# Altium PCB SplitFlapDriverATtiny1616V4.kicad_pcb(1).PcbDoc
Units mm, origin at the board's own origin, x right, y up, seen from the top; angles counter-clockwise.
Board outline 30 x 60 mm, 2 copper layers (F.Cu, B.Cu); 25 components, 38 nets, 103 pads, 22 vias.
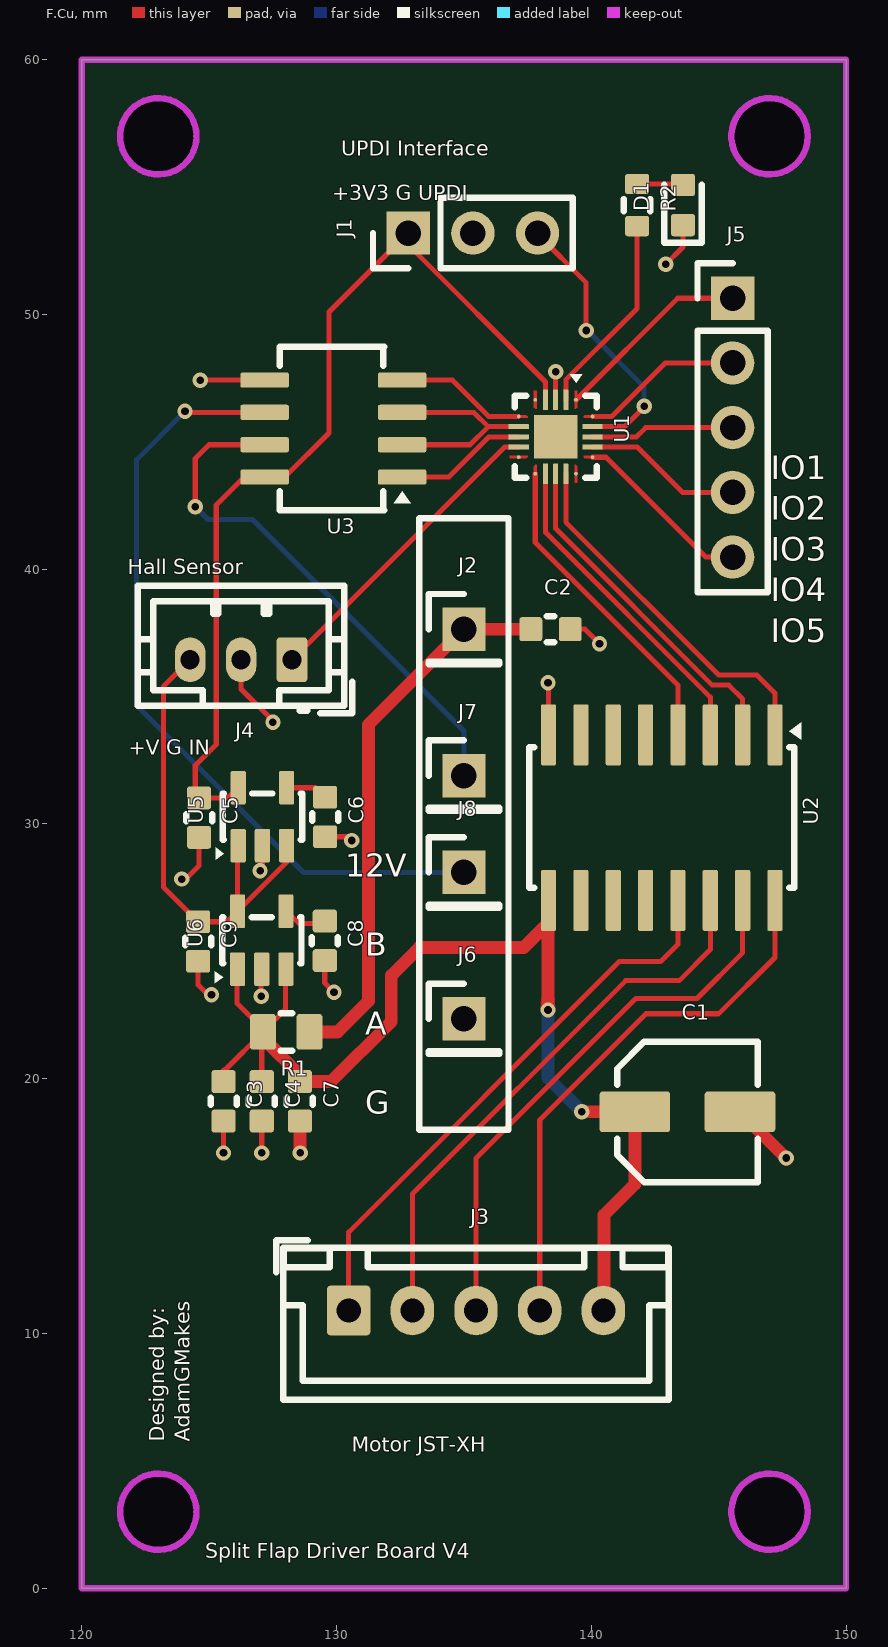
[diagram p0: F.Cu view]
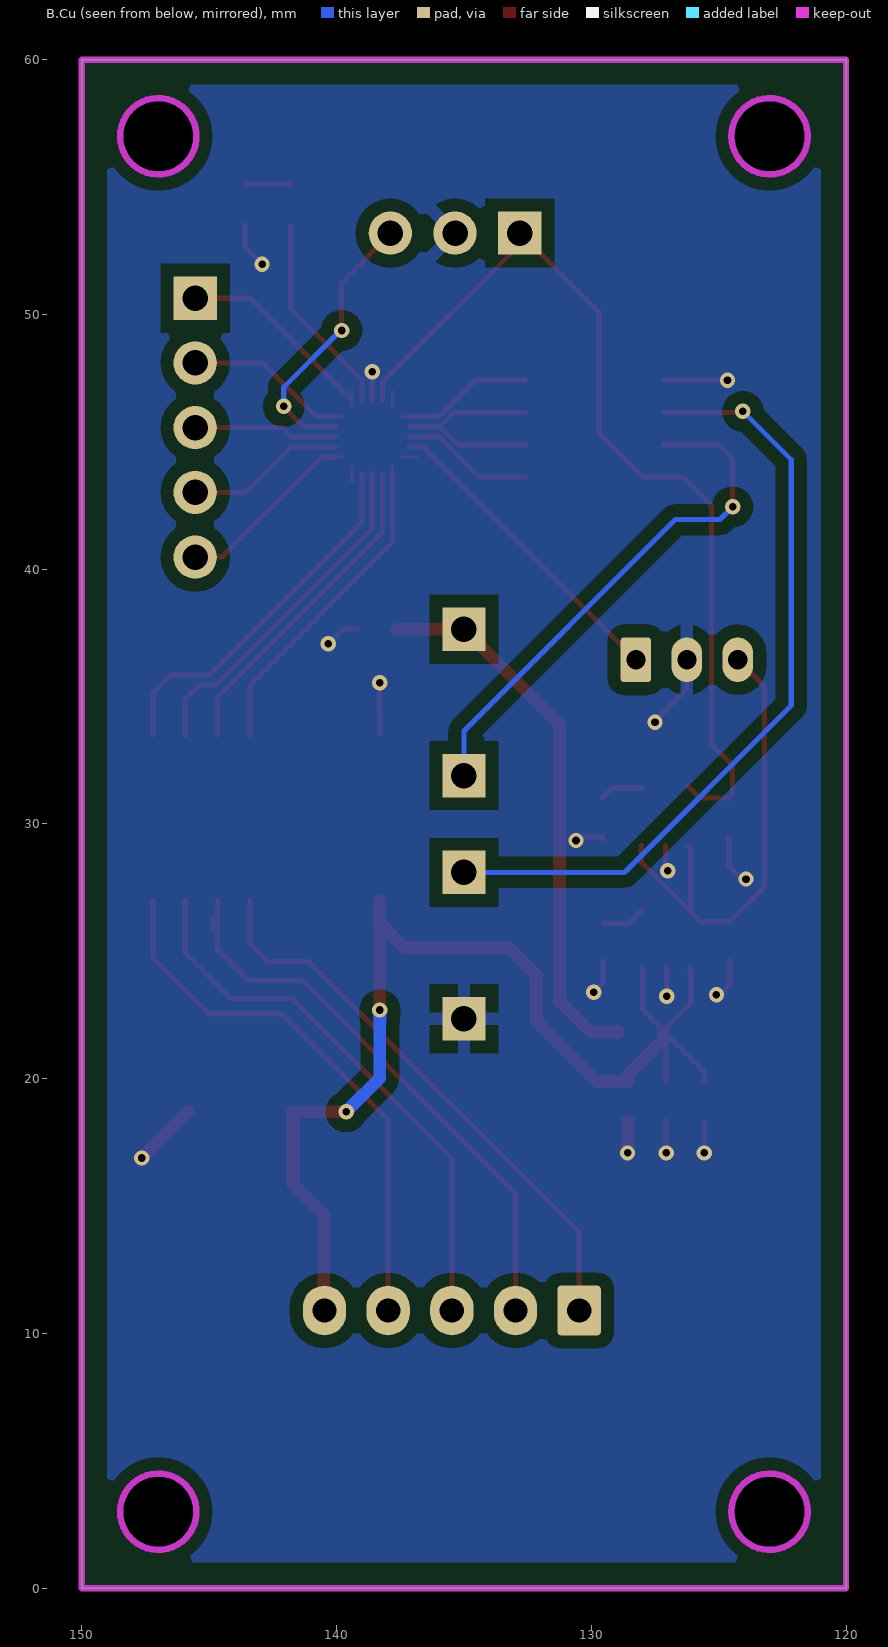
[diagram p1: B.Cu view, seen from below]

## Layer stack, top to bottom
F.Mask: solder mask 0.0102, Solder Resist, Dk 3.5
F.Cu: signal copper 0.0356
Dielectric 1: dielectric 0.32, FR-4, Dk 4.8
B.Cu: signal copper 0.0356
B.Mask: solder mask 0.0102, Solder Resist, Dk 3.5

## Board outline
120,60 120,0 150,0 150,60 120,60
cut-out: 148.507,3 148.478,3.294 148.393,3.577 148.253,3.837 148.066,4.066 147.837,4.253 147.577,4.393 147.294,4.478 147,4.507 146.706,4.478 146.423,4.393 146.163,4.253 145.934,4.066 145.747,3.837 145.607,3.577 145.522,3.294 145.493,3 145.522,2.706 145.607,2.423 145.747,2.163 145.934,1.934 146.163,1.747 146.423,1.607 146.706,1.522 147,1.493 147.294,1.522 147.577,1.607 147.837,1.747 148.066,1.934 148.253,2.163 148.393,2.423 148.478,2.706 148.507,3
cut-out: 148.507,57 148.478,57.294 148.393,57.577 148.253,57.837 148.066,58.066 147.837,58.253 147.577,58.393 147.294,58.478 147,58.507 146.706,58.478 146.423,58.393 146.163,58.253 145.934,58.066 145.747,57.837 145.607,57.577 145.522,57.294 145.493,57 145.522,56.706 145.607,56.423 145.747,56.163 145.934,55.934 146.163,55.747 146.423,55.607 146.706,55.522 147,55.493 147.294,55.522 147.577,55.607 147.837,55.747 148.066,55.934 148.253,56.163 148.393,56.423 148.478,56.706 148.507,57
cut-out: 124.507,3 124.478,3.294 124.393,3.577 124.253,3.837 124.066,4.066 123.837,4.253 123.577,4.393 123.294,4.478 123,4.507 122.706,4.478 122.423,4.393 122.163,4.253 121.934,4.066 121.747,3.837 121.607,3.577 121.522,3.294 121.493,3 121.522,2.706 121.607,2.423 121.747,2.163 121.934,1.934 122.163,1.747 122.423,1.607 122.706,1.522 123,1.493 123.294,1.522 123.577,1.607 123.837,1.747 124.066,1.934 124.253,2.163 124.393,2.423 124.478,2.706 124.507,3
cut-out: 124.507,57 124.478,57.294 124.393,57.577 124.253,57.837 124.066,58.066 123.837,58.253 123.577,58.393 123.294,58.478 123,58.507 122.706,58.478 122.423,58.393 122.163,58.253 121.934,58.066 121.747,57.837 121.607,57.577 121.522,57.294 121.493,57 121.522,56.706 121.607,56.423 121.747,56.163 121.934,55.934 122.163,55.747 122.423,55.607 122.706,55.522 123,55.493 123.294,55.522 123.577,55.607 123.837,55.747 124.066,55.934 124.253,56.163 124.393,56.423 124.478,56.706 124.507,57

## Design rules (kind name [scope] priority, off if disabled: settings)
Clearance "Clearence 0.5_Polygon" [InNamedPolygon('B.Cu-GND')] p1: gap=0.5 ignorepadtopadclearanceinfootprint=FALSE
Clearance "Clearence 0.1_NetClass" [InNetClass('Default')] p2: gap=0.1 ignorepadtopadclearanceinfootprint=FALSE
MinimumSolderMaskSliver [All] p1: minsoldermaskwidth=0
PolygonConnect Polygon_B.Cu-GND_ConnectDirect [IsNamedPolygon('B.Cu-GND') vs IsVia] p1: connectstyle=Direct reliefconductorwidth=0.254 reliefentries=4 polygonreliefangle="90 Angle" airgapwidth=0.254
PolygonConnect Polygon_B.Cu-GND_ConnectRelief45 [IsNamedPolygon('B.Cu-GND') vs (IsThruPin or IsSMTPin) and (PadShape_AllLayers = 'Round')] p2: connectstyle=Relief reliefconductorwidth=0.5 reliefentries=4 polygonreliefangle="45 Angle" airgapwidth=0.5
PolygonConnect Polygon_B.Cu-GND_ConnectRelief90 [IsNamedPolygon('B.Cu-GND') vs (IsThruPin or IsSMTPin) and (PadShape_AllLayers <> 'Round')] p3: connectstyle=Relief reliefconductorwidth=0.5 reliefentries=4 polygonreliefangle="90 Angle" airgapwidth=0.5
PolygonConnect Polygon_B.Cu-+VBUSF_ConnectDirect [IsNamedPolygon('B.Cu-+VBUSF')] p4: connectstyle=Direct reliefconductorwidth=0.254 reliefentries=4 polygonreliefangle="90 Angle" airgapwidth=0.254
PolygonConnect Polygon_F.Cu-+VBUSF_ConnectDirect [IsNamedPolygon('F.Cu-+VBUSF')] p5: connectstyle=Direct reliefconductorwidth=0.254 reliefentries=4 polygonreliefangle="90 Angle" airgapwidth=0.254
RoutingVias [All] p1: holewidth=0.711 width=1.27 viastyle="Through Hole" minholewidth=0.711 minwidth=1.27 maxholewidth=0.711 maxwidth=1.27
SilkToSilkClearance [All] p1: silktosilkclearance=0
SilkToSolderMaskClearance [IsPad] p1: minsilkscreentomaskgap=0 clearancetoexposedcopper=TRUE
SolderMaskExpansion [All] p1: expansion=0 istentingtop=FALSE
Width [All] p1: maxlimit=10 minlimit=0.254 preferedwidth=0.2 minimp=50.000000 maximp=50.000000 favimp=50.000000
27 further rules are at their usual default settings.

## Classes and differential pairs
net class Default: +3V3 +5V +VBUS +VBUSF DE{slash}RE GND HALL_IN IO1 IO2 IO3 IO4 IO5 M1 M2 M3 M4 Net-(D1-A) Net-(U5-BP) Net-(U6-BP) RS465_A RS465_B RXD STATUS_LED TXD ULN_IN1 ULN_IN2 ULN_IN3 ULN_IN4 unconnected-(U1-PA4-Pad5) unconnected-(U1-PB4-Pad10) unconnected-(U1-PC0-Pad15) unconnected-(U2-I5-Pad5) unconnected-(U2-I6-Pad6) unconnected-(U2-I7-Pad7) unconnected-(U2-O5-Pad12) unconnected-(U2-O6-Pad11) unconnected-(U2-O7-Pad10) UPDI

## Components (designator, comment, footprint, x,y, rotation, side; value= is the part's Value field where it differs from the comment)
C1 "Comment" C_Elec_5x5.4 143.775,18.7 r0 top value=100u
C2 "Comment" C_0603_1608Metric 138.4,37.65 r0 top value=470n
C3 "Comment" C_0603_1608Metric 125.562,19.112 r270 top value=470n
C4 "Comment" C_0603_1608Metric 127.062,19.112 r270 top value=10u
C5 "Comment" C_0603_1608Metric 124.6,30.25 r270 top value=10u
C6 "Comment" C_0603_1608Metric 129.55,30.275 r270 top value=470n
C7 "Comment" C_0603_1608Metric 128.562,19.112 r270 top value=100n
C8 "Comment" C_0603_1608Metric 129.538,25.412 r270 top value=470n
C9 "Comment" C_0603_1608Metric 124.562,25.388 r270 top value=10u
D1 "Comment" LED_0603_1608Metric 143.6,54.3 r90 top value=LED
J1 "Comment" PinHeader_1x03_P2.54mm_Vertical 132.81,53.2 r90 top value="UPDI Programming"
J2 "Comment" PinHeader_1x01_P2.54mm_Vertical 135,37.65 r0 top value=Conn_01x01_Pin
J3 "Comment" JST_XH_B5B-XH-A_1x05_P2.50mm_Vertical 130.475,10.9 r0 top value="Stepper Connector"
J4 "Comment" JST_PH_B3B-PH-K_1x03_P2.00mm_Vertical 128.25,36.45 r180 top value="Hall Effect"
J5 "Comment" PinHeader_1x05_P2.54mm_Vertical 145.55,50.64 r0 top value=Conn_01x05_Pin
J6 "Comment" PinHeader_1x01_P2.54mm_Vertical 135,22.35 r0 top value=Conn_01x01_Pin
J7 "Comment" PinHeader_1x01_P2.54mm_Vertical 135,31.9 r0 top value=Conn_01x01_Pin
J8 "Comment" PinHeader_1x01_P2.54mm_Vertical 135,28.1 r0 top value=Conn_01x01_Pin
R1 "Comment" R_0805_2012Metric 128.025,21.838 r180 top value=0R
R2 "Comment" R_0603_1608Metric 141.8,54.3 r270 top value=60R
U1 "Comment" VQFN-20-1EP_3x3mm_P0.4mm_EP1.7x1.7mm 138.6,45.2 r270 top value=ATtiny1616-MNR
U2 "Comment" SOIC-16W_5.3x10.2mm_P1.27mm 142.767,30.25 r270 top value=ULN2003ADR
U3 "Comment" SOIC-8_5.3x6.2mm_P1.27mm 129.875,45.525 r180 top value=SN65HVD72DR
U5 "Comment" SOT-23-5 127.088,30.287 r90 top value=SPX3819M5-L-3-3
U6 "Comment" SOT-23-5 127.062,25.438 r90 top value=SPX3819M5-L-5-0

## Footprints (in the part's own frame and the unit in brackets; to place one, negate y for a bottom-side part, rotate by r counter-clockwise, add the part's x,y. Pads: shape width x height; smd on the part's side, far side on the other; paste and mask are expansions set on the pad)
C_0603_1608Metric [mm]
  rrect25% 0.9x0.95 smd mask+0: 1(-0.775,0) 2(0.775,0)
  silkscreen extent -0.14,-0.51 0.14,0.51
C_Elec_5x5.4 [mm]
  rrect16% 2.775x1.6 smd mask+0: 1(-2.063,0) 2(2.063,0)
  silkscreen extent -2.76,-2.76 2.76,2.76
JST_PH_B3B-PH-K_1x03_P2.00mm_Vertical [mm]
  rrect21% 1.2x1.75 hole 0.75 paste-2539.97 mask+0: 1(0,0)
  rrect100% 1.2x1.75 hole 0.75 paste-2539.97 mask+0: 2(2,0) 3(4,0)
  silkscreen extent -2.36,-2.91 6.06,2.11
JST_XH_B5B-XH-A_1x05_P2.50mm_Vertical [mm]
  rrect15% 1.7x1.95 hole 0.95 paste-2539.97 mask+0: 1(0,0)
  rrect100% 1.7x1.95 hole 0.95 paste-2539.97 mask+0: 2(2.5,0) 3(5,0) 4(7.5,0) 5(10,0)
  silkscreen extent -2.85,-3.51 12.56,2.75
LED_0603_1608Metric [mm]
  rrect25% 0.875x0.95 smd mask+0: 1(-0.787,0) 2(0.787,0)
  silkscreen extent -1.49,-0.73 0.8,0.73
PinHeader_1x01_P2.54mm_Vertical [mm]
  rect 1.7x1.7 hole 1 paste-2539.97 mask+0: 1(0,0)
  silkscreen extent -1.38,-1.38 1.38,1.38
PinHeader_1x03_P2.54mm_Vertical [mm]
  rect 1.7x1.7 hole 1 paste-2539.97 mask+0: 1(0,0)
  round 1.7 hole 1 paste-2539.97 mask+0: 2(0,-2.54) 3(0,-5.08)
  silkscreen extent -1.38,-6.46 1.38,1.38
PinHeader_1x05_P2.54mm_Vertical [mm]
  rect 1.7x1.7 hole 1 paste-2539.97 mask+0: 1(0,0)
  round 1.7 hole 1 paste-2539.97 mask+0: 2(0,-2.54) 3(0,-5.08) 4(0,-7.62) 5(0,-10.16)
  silkscreen extent -1.38,-11.54 1.38,1.38
R_0603_1608Metric [mm]
  rrect25% 0.8x0.95 smd mask+0: 1(-0.825,0) 2(0.825,0)
  silkscreen extent -0.24,-0.52 0.24,0.52
R_0805_2012Metric [mm]
  rrect24% 1.025x1.4 smd mask+0: 1(-0.913,0) 2(0.913,0)
  silkscreen extent -0.23,-0.73 0.23,0.73
SOIC-8_5.3x6.2mm_P1.27mm [mm]
  rrect25% 1.9x0.6 smd mask+0: 1(-2.7,1.905) 2(-2.7,0.635) 3(-2.7,-0.635) 4(-2.7,-1.905) 5(2.7,-1.905) 6(2.7,-0.635) 7(2.7,0.635) 8(2.7,1.905)
  silkscreen extent -3.04,-3.21 2.1,3.21
SOIC-16W_5.3x10.2mm_P1.27mm [mm]
  rrect25% 2.4x0.6 smd mask+0: 1(-3.25,4.445) 2(-3.25,3.175) 3(-3.25,1.905) 4(-3.25,0.635) 5(-3.25,-0.635) 6(-3.25,-1.905) 7(-3.25,-3.175) 8(-3.25,-4.445) 9(3.25,-4.445) 10(3.25,-3.175) 11(3.25,-1.905) 12(3.25,-0.635) 13(3.25,0.635) 14(3.25,1.905) 15(3.25,3.175) 16(3.25,4.445)
  silkscreen extent -3.74,-5.21 2.76,5.48
SOT-23-5 [mm]
  rrect25% 1.325x0.6 smd mask+0: 1(-1.138,0.95) 2(-1.138,0) 3(-1.138,-0.95) 4(1.138,-0.95) 5(1.138,0.95)
  silkscreen extent -1.69,-1.56 0.91,1.84
VQFN-20-1EP_3x3mm_P0.4mm_EP1.7x1.7mm [mm]
  round 0.143 smd mask+0: 1(-1.45,0.8) 5(-1.45,-0.8) 6(-0.8,-1.45) 10(0.8,-1.45) 11(1.45,-0.8) 15(1.45,0.8) 16(0.8,1.45) 20(-0.8,1.45)
  rrect25% 0.8x0.2 smd mask+0: 2(-1.45,0.4) 3(-1.45,0) 4(-1.45,-0.4) 12(1.45,-0.4) 13(1.45,0) 14(1.45,0.4)
  rrect25% 0.2x0.8 smd mask+0: 7(-0.4,-1.45) 8(0,-1.45) 9(0.4,-1.45) 17(0.4,1.45) 18(0,1.45) 19(-0.4,1.45)
  rect 1.7x1.7 smd paste-1.7 mask+0: 21(0,0)
  rrect25% 0.69x0.69 on Top Paste mask-0.69: Un1(-0.425,0.425) Un2(-0.425,-0.425) Un3(0.425,0.425) Un4(0.425,-0.425)
  F.Cu region: -0.75,1.1 -0.799,1.1 -0.85,1.151 -0.85,1.8 -0.75,1.8
  F.Cu region: 0.85,1.151 0.799,1.1 0.75,1.1 0.75,1.8 0.85,1.8
  F.Cu region: 1.8,0.75 1.1,0.75 1.1,0.799 1.151,0.85 1.8,0.85
  F.Cu region: 1.8,-0.85 1.151,-0.85 1.1,-0.799 1.1,-0.75 1.8,-0.75
  F.Cu region: 0.85,-1.151 0.85,-1.8 0.75,-1.8 0.75,-1.1 0.799,-1.1
  F.Cu region: -0.75,-1.8 -0.85,-1.8 -0.85,-1.151 -0.799,-1.1 -0.75,-1.1
  F.Cu region: -1.1,-0.799 -1.151,-0.85 -1.8,-0.85 -1.8,-0.75 -1.1,-0.75
  F.Cu region: -1.1,0.799 -1.1,0.75 -1.8,0.75 -1.8,0.85 -1.151,0.85
  silkscreen extent -2.45,-1.61 1.61,1.61

## Part data
C1: library part C_Elec_5x5.4, "SMD capacitor, aluminum electrolytic nonpolar, 5.0x5.4mm", Datasheet=~, Description="Unpolarized capacitor", ki_fp_filters=C_*
C2 C3 C4 C5 C6 C7 C8 C9: library part C_0603_1608Metric, "Capacitor SMD 0603 (1608 Metric), square (rectangular) end terminal, IPC-7351 nominal, (Body size source: IPC-SM-782 page 76, https://www.pcb-3d.com/wordpress/wp-content/uploads/ipc-sm-782a_amendment_1_and_2.pdf), generated with kicad-footprint-generator", Datasheet=~, Description="Unpolarized capacitor", ki_fp_filters=C_*
D1: library part LED_0603_1608Metric, "LED SMD 0603 (1608 Metric), square (rectangular) end terminal, IPC-7351 nominal, (Body size source: http://www.tortai-tech.com/upload/download/2011102023233369053.pdf), generated with kicad-footprint-generator", Datasheet=~, Description="Light emitting diode", Sim.Pins="1=K 2=A", ki_fp_filters="LED* LED_SMD:* LED_THT:*"
J1: library part PinHeader_1x03_P2.54mm_Vertical, "Through hole straight pin header, 1x03, 2.54mm pitch, single row", Datasheet=~, Description="Generic connector, single row, 01x03, script generated", ki_fp_filters=Connector*:*_1x??_*
J2 J6 J7 J8: library part PinHeader_1x01_P2.54mm_Vertical, "Through hole straight pin header, 1x01, 2.54mm pitch, single row", Datasheet=~, Description="Generic connector, single row, 01x01, script generated", ki_fp_filters=Connector*:*_1x??_*
J3: library part JST_XH_B5B-XH-A_1x05_P2.50mm_Vertical, "JST XH series connector, B5B-XH-A (http://www.jst-mfg.com/product/pdf/eng/eXH.pdf), generated with kicad-footprint-generator", Datasheet=~, Description="Generic connector, single row, 01x05, script generated", ki_fp_filters=Connector*:*_1x??_*
J4: library part JST_PH_B3B-PH-K_1x03_P2.00mm_Vertical, "JST PH series connector, B3B-PH-K (http://www.jst-mfg.com/product/pdf/eng/ePH.pdf), generated with kicad-footprint-generator", Datasheet=~, Description="Generic connector, single row, 01x03, script generated", ki_fp_filters=Connector*:*_1x??_*
J5: library part PinHeader_1x05_P2.54mm_Vertical, "Through hole straight pin header, 1x05, 2.54mm pitch, single row", Datasheet=~, Description="Generic connector, single row, 01x05, script generated", ki_fp_filters=Connector*:*_1x??_*
R1: library part R_0805_2012Metric, "Resistor SMD 0805 (2012 Metric), square (rectangular) end terminal, IPC-7351 nominal, (Body size source: IPC-SM-782 page 72, https://www.pcb-3d.com/wordpress/wp-content/uploads/ipc-sm-782a_amendment_1_and_2.pdf), generated with kicad-footprint-generator", Datasheet=~, Description=Resistor, ki_fp_filters=R_*
R2: library part R_0603_1608Metric, "Resistor SMD 0603 (1608 Metric), square (rectangular) end terminal, IPC-7351 nominal, (Body size source: IPC-SM-782 page 72, https://www.pcb-3d.com/wordpress/wp-content/uploads/ipc-sm-782a_amendment_1_and_2.pdf), generated with kicad-footprint-generator", Datasheet=~, Description=Resistor, ki_fp_filters=R_*
U1: library part VQFN-20-1EP_3x3mm_P0.4mm_EP1.7x1.7mm, "VQFN, 20 Pin (http://ww1.microchip.com/downloads/en/DeviceDoc/20%20Lead%20VQFN%203x3x0_9mm_1_7EP%20U2B%20C04-21496a.pdf), generated with kicad-footprint-generator ipc_noLead_generator.py", Manufacturer="Microchip Tech", Manufacturer Part Number=ATTINY1616-MNR, JLCPCB Part Number=C507118, Datasheet=http://ww1.microchip.com/downloads/en/DeviceDoc/ATtiny3216_ATtiny1616-data-sheet-40001997B.pdf, Description="20MHz, 16kB Flash, 2kB SRAM, 256B EEPROM, SOIC-20", ki_fp_filters=SOIC*7.5x12.8mm*P1.27mm*
U2: library part SOIC-16W_5.3x10.2mm_P1.27mm, "SOIC, 16 Pin (http://www.ti.com/lit/ml/msop002a/msop002a.pdf), generated with kicad-footprint-generator ipc_gullwing_generator.py", Manufacturer="Texas Instruments", Manufacturer Part Number=ULN2003ADR, JLCPCB Part Number=C7512, Datasheet=http://www.ti.com/lit/ds/symlink/uln2003a.pdf, Description="High Voltage, High Current Darlington Transistor Arrays, SOIC16/SOIC16W/DIP16/TSSOP16", ki_fp_filters="DIP*W7.62mm* SOIC*3.9x9.9mm*P1.27mm* SSOP*4.4x5.2mm*P0.65mm* TSSOP*4.4x5mm*P0.65mm* SOIC*W*5.3x10.2mm*P1.27mm*"
U3: library part SOIC-8_5.3x6.2mm_P1.27mm, "SOIC, 8 Pin (Texas Instruments (based on JEITA/EIAJ 08-001-BBA), 208 mils width, https://www.ti.com/lit/ml/msop001a/msop001a.pdf), generated with kicad-footprint-generator ipc_gullwing_generator.py", Manufacturer="Texas Instruments", Manufacturer Part Number=SN65HVD72DR, JLCPCB Part Number=C48125, Datasheet=http://www.ti.com/lit/ds/symlink/sn65hvd11-ht.pdf, Description="3.3V, RS-485 Transceiver, SOIC-8", ki_fp_filters=SOIC*3.9x4.9mm*P1.27mm*
U5 U6: library part SOT-23-5, "SOT, 5 Pin (JEDEC MO-178 Var AA https://www.jedec.org/document_search?search_api_views_fulltext=MO-178), generated with kicad-footprint-generator ipc_gullwing_generator.py", Datasheet=https://www.exar.com/content/document.ashx?id=22106&languageid=1033&type=Datasheet&partnumber=SPX3819&filename=SPX3819.pdf&part=SPX3819, ki_fp_filters=SOT?23*
  U5: Description="500mA Low drop-out regulator, Fixed Output 3.3V, SOT-23-5"
  U6: Description="500mA Low drop-out regulator, Fixed Output 5.0V, SOT-23-5"

## Via types
v1: diameter 0.6, hole 0.3, F.Cu to B.Cu, tented both sides, 22 vias

## Nets (pads, with @x,y where several pads share a name; then routed paths per layer and width w, separated by ;. In a path a pad name is that pad's centre, name@x,y a point inside that pad or via, vN(x,y) a via of type N, cw(c..) or ccw(c..) an arc to the next point about the centre after c; other vN are vias at no path point)
+3V3: C5.1 J1.1 U1.4 U3.8 U5.5 | length 37.2
  F.Cu w0.2: U5.5@126.225,31.512 U5.5 125.738,31.025 C5.1 124.45,31.175 124.45,32.3 125.276,33.126 125.276,42.521 126.375,43.62 127.97,43.62 129.7,45.35 129.7,50.1 132.8,53.2 J1.1 132.81,52.74 138.2,47.35 U1.4
+5V: C9.1 J4.3 U5.1 U5.3 U6.5 | length 19
  F.Cu w0.2: J4.3 123.2,35.4 123.2,27.525 C9.1 125.7,26.163 U6.5 ; U5.1@126.187,29.1 U5.1 126.113,29.125 U6.5 ; U5.3 128.038,28.5 U6.5
+VBUS: C2.1 J2.1 R1.1 | length 21.7
  F.Cu w0.2: R1.1 R1.1@129.05,21.838
  F.Cu w0.5: R1.1 130.037,21.838 131.25,23.05 131.25,33.9 J2.1 C2.1
+VBUSF: C1.1 C3.1 C4.1 C7.1 J3.5 R1.2 U2.9 U6.1 U6.3 | length 47.1
  F.Cu w0.2: 125.562,20.338 C3.1 125.562,20.287 R1.2@127.162,21.888 ; U6.1@126.137,24.312 126.087,24.362 126.087,22.962 R1.2@127.162,21.888 ; C4.1 127.062,21.788 R1.2@127.162,21.888 ; U6.3@127.988,24.362 127.988,22.712 R1.2@127.162,21.888
  F.Cu w0.5: R1.2@127.162,21.888 127.162,21.55 128.562,20.15 C7.1 129.788,19.887 132.15,22.25 132.15,24.05 133.25,25.15 137.35,25.15 138.322,26.123 U2.9 138.3,26.978 138.3,25.65 v1(138.3,22.7) ; v1(139.625,18.7) C1.1 141.713,15.863 140.5,14.65 140.5,10.925 J3.5
  B.Cu w0.5: v1(138.3,22.7) 138.3,20.025 v1(139.625,18.7)
DE{slash}RE: U1.7 U3.2 U3.3 | length 8.5
  F.Cu w0.2: U3.2 135.24,44.89 135.95,45.6 ; U3.3 135.39,46.16 135.95,45.6 ; U1.7 135.95,45.6
GND: C1.2 C2.2 C3.2 C4.2 C5.2 C6.2 C7.2 C8.2 C9.2 D1.1 J1.2 J4.2 J6.1 U1.3 U2.8 U3.5 U5.2 U6.2 | length 27.7
  F.Cu w0.2: v1(123.925,27.837) 124.075,27.837 124.425,28.188 124.6,28.362 C5.2 ; C9.2 124.562,23.687 124.95,23.3 v1(125.087,23.3) ; v1(124.65,47.425) 124.655,47.43 U3.5 ; v1(125.562,17.087) C3.2 ; J4.2 126.25,35.3 127.5,34.05 v1(127.5,34) ; v1(126.996,28.166) 126.996,28.196 127.088,28.287 U5.2 ; v1(127.038,23.237) U6.2@127.038,24.362 ; v1(127.062,17.087) C4.2 ; v1@128.562,17.1 v1(128.575,17.087) ; C8.2 129.538,23.763 v1(129.9,23.4) ; C6.2@129.55,29.412 C6.2 130.45,29.5 v1(130.6,29.35) ; U2.8@138.3,34.485 138.3,33.522 U2.8 138.322,35.527 v1(138.3,35.55) ; U1.3 v1(138.6,47.75) ; C2.2 139.75,37.65 v1(140.325,37.075) ; v1(142.925,51.975) 143.6,52.65 D1.1 ; v1@147.625,16.8 147.625,16.862 v1(147.65,16.887)
  F.Cu w0.5: v1@128.562,17.1 C7.2 ; C1.2 v1(147.65,16.887) v1@147.65,16.825
HALL_IN: J4.1 U1.9 | length 12.4
  F.Cu w0.2: J4.1 136.6,44.8 U1.9
IO1: J5.1 U1.1 | length 7.9
  F.Cu w0.2: U1.1 143.39,50.64 J5.1@145.6,50.64
IO2: J5.2 U1.20 | length 6.4
  F.Cu w0.2: U1.20 140.8,46 142.9,48.1 J5.2@145.6,48.1
IO3: J5.3 U1.18 | length 5.7
  F.Cu w0.2: U1.18 141.775,45.2 142.135,45.56 J5.3@145.6,45.56
IO4: J5.4 U1.17 | length 6.3
  F.Cu w0.2: U1.17 141.8,44.8 143.58,43.02 J5.4@145.6,43.02
IO5: J5.5 U1.16 | length 7.8
  F.Cu w0.2: U1.16 140.575,44.4 144.495,40.48 J5.5@145.6,40.48 ; J5.5@145.085,41.04 J5.5@145.7,41.04
M1: J3.4 U2.16 | length 21.6
  F.Cu w0.2: J3.4 137.975,18.375 142.15,22.55 145,22.55 147.212,24.763 U2.16
M2: J3.3 U2.15 | length 21.8
  F.Cu w0.2: J3.3 135.475,16.875 141.75,23.15 144.15,23.15 145.942,24.943 U2.15
M3: J3.2 U2.14 | length 22.7
  F.Cu w0.2: J3.2 132.975,15.475 141.35,23.85 143.45,23.85 144.672,25.073 U2.14 ; U2.14@144.851,25.875 U2.14@144.851,26.351
M4: J3.1 U2.13 | length 22.4
  F.Cu w0.2: J3.1 130.475,13.975 141.1,24.6 142.725,24.6 143.402,25.277 U2.13
Net-(D1-A): D1.2 R2.1 | length 1.8
  F.Cu w0.2: R2.1 143.562,55.125 D1.2
Net-(U5-BP): C6.1 U5.4 | length 1.7
  F.Cu w0.2: U5.4 129.175,31.425 C6.1
Net-(U6-BP): C8.1 U6.4 | length 1.8
  F.Cu w0.2: U6.4@127.988,26.637 128.538,26.087 C8.1@129.538,26.087
RS465_A: J8.1 U3.6 | length 31
  F.Cu w0.2: v1(124.05,46.2) 124.09,46.16 U3.6
  B.Cu w0.2: v1(124.05,46.2) 122.15,44.3 122.15,34.65 128.7,28.1 J8.1
RS465_B: J7.1 U3.7 | length 20.8
  F.Cu w0.2: v1(124.45,42.45) 124.45,44.35 124.99,44.89 U3.7
  B.Cu w0.2: v1(124.45,42.45) 124.95,41.95 126.7,41.95 135,33.65 J7.1
RXD: U1.8 U3.1 | length 5.2
  F.Cu w0.2: U3.1 134.408,43.62 135.988,45.2 U1.8
STATUS_LED: R2.2 U1.2 | length 8
  F.Cu w0.2: U1.2 139,47.441 141.8,50.241 R2.2
TXD: U1.6 U3.4 | length 5.2
  F.Cu w0.2: U3.4 134.545,47.43 135.975,46 U1.6
ULN_IN1: U1.14 U2.1 | length 14.5
  F.Cu w0.2: U1.14 139,41.85 145,35.85 146.5,35.85 147.212,35.137 U2.1
ULN_IN2: U1.13 U2.2 | length 13.7
  F.Cu w0.2: U1.13 138.6,41.6 144.75,35.45 145.4,35.45 145.942,34.907 U2.2
ULN_IN3: U1.12 U2.3 | length 12.9
  F.Cu w0.2: U1.12 138.2,41.45 144.672,34.977 U2.3
ULN_IN4: U1.11 U2.4 | length 12.6
  F.Cu w0.2: U1.11 137.8,41.05 143.402,35.447 U2.4
unconnected-(U1-PA4-Pad5): U1.5
unconnected-(U1-PB4-Pad10): U1.10
unconnected-(U1-PC0-Pad15): U1.15
unconnected-(U2-I5-Pad5): U2.5
unconnected-(U2-I6-Pad6): U2.6
unconnected-(U2-I7-Pad7): U2.7
unconnected-(U2-O5-Pad12): U2.12
unconnected-(U2-O6-Pad11): U2.11
unconnected-(U2-O7-Pad10): U2.10
UPDI: J1.3 U1.19 | length 10.9
  F.Cu w0.2: J1.3 137.89,53.16 139.8,51.25 v1(139.8,49.375) ; U1.19 141.3,45.6 142.075,46.375 v1(142.075,46.4)
  B.Cu w0.2: v1(139.8,49.375) 139.85,49.375 142.075,47.15 v1(142.075,46.4)
pads on no net: U1.21 U1.Un1 U1.Un2 U1.Un3 U1.Un4

## Polygon pours and split planes (outlines as drawn)
+VBUSF on F.Cu "F.Cu-+VBUSF" (solid, remove dead copper, pour order 30003): 138.55,23.294 138.05,23.294 138.006,22.759 138.3,22.699 138.594,22.759
GND on B.Cu "B.Cu-GND" (solid, remove dead copper, pour order 30004): 121,59.026 149,59.026 149,1.026 121,1.026
+VBUSF on B.Cu "B.Cu-+VBUSF" (solid, remove dead copper, pour order 30002): 138.05,22.106 138.55,22.106 138.594,22.641 138.3,22.701 138.006,22.641

## Keep-outs
Edge.Cuts:
  circle w0.254: c147,3 r1.5
  circle w0.254: c147,57 r1.5
  circle w0.254: c123,3 r1.5
  circle w0.254: c123,57 r1.5
  lines w0: 120,0 150,0 150,60 120,60 120,0
  lines w0.254: 120,0 150,0 150,60 120,60 120,0

## Silkscreen, mask and mechanical layers (free items; w line width, h text height)
F.SilkS:
  lines w0.254: 133.25,18 136.75,18 136.75,42 133.25,42 133.25,18
  text "UPDI Interface" at 130.175,56.039 h1
  text "+3V3 G UPDI" at 129.825,54.294 h1
  text "Hall Sensor" at 121.8,39.614 h1
  text "IO1 / IO2 / IO3 / IO4 / IO5" at 147.05,36.829 h1.6
  text "+V G IN" at 121.85,32.516 h1
  text "12V /  /   B /  /   A /  /   G" at 130.35,18.307 h1.55
  text "Designed by: / AdamGMakes" at 124.423,5.75 h1 r90
  text "Motor JST-XH" at 130.6,5.161 h1
  text "Split Flap Driver Board V4" at 124.85,0.97 h1